# Altium PCB Mosione.PcbDoc
Units mm, origin at the board's own origin, x right, y up, seen from the top; angles counter-clockwise.
Board outline 70.36 x 44.96 mm, 2 copper layers (Top Layer, Bottom Layer); 21 components, 31 nets, 104 pads, 14 vias.
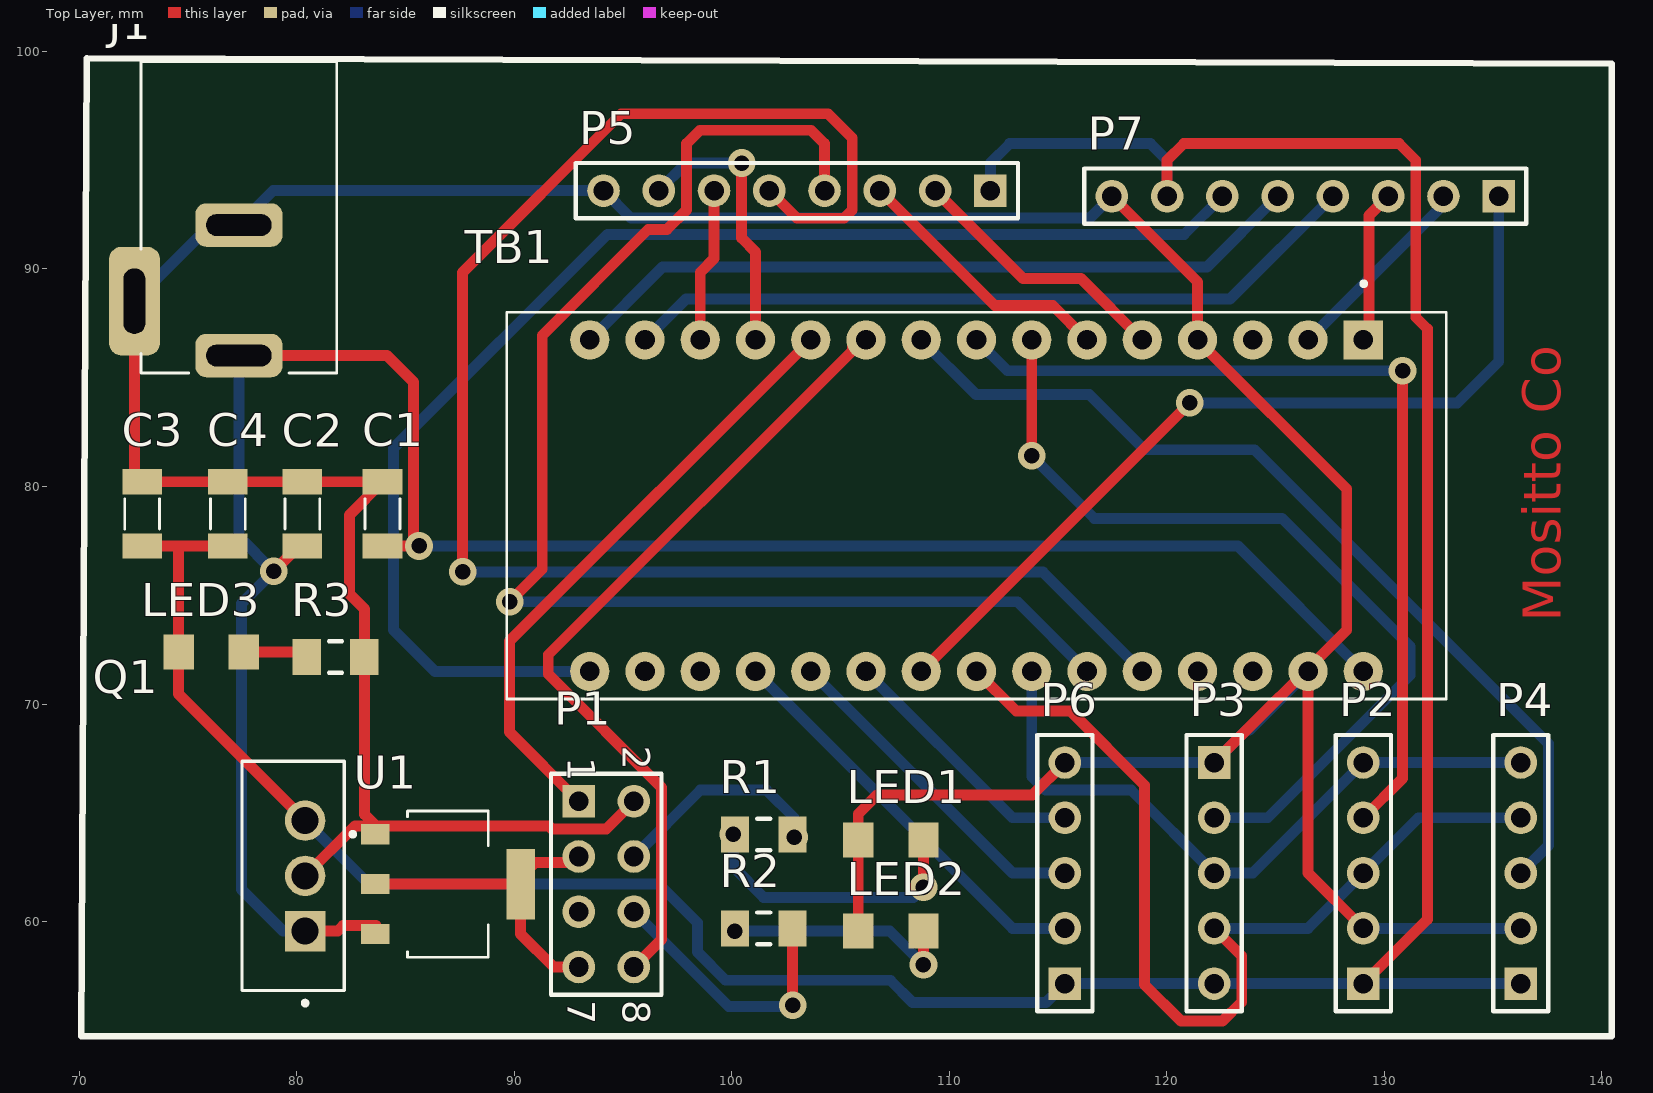
[diagram p0: Top Layer view]
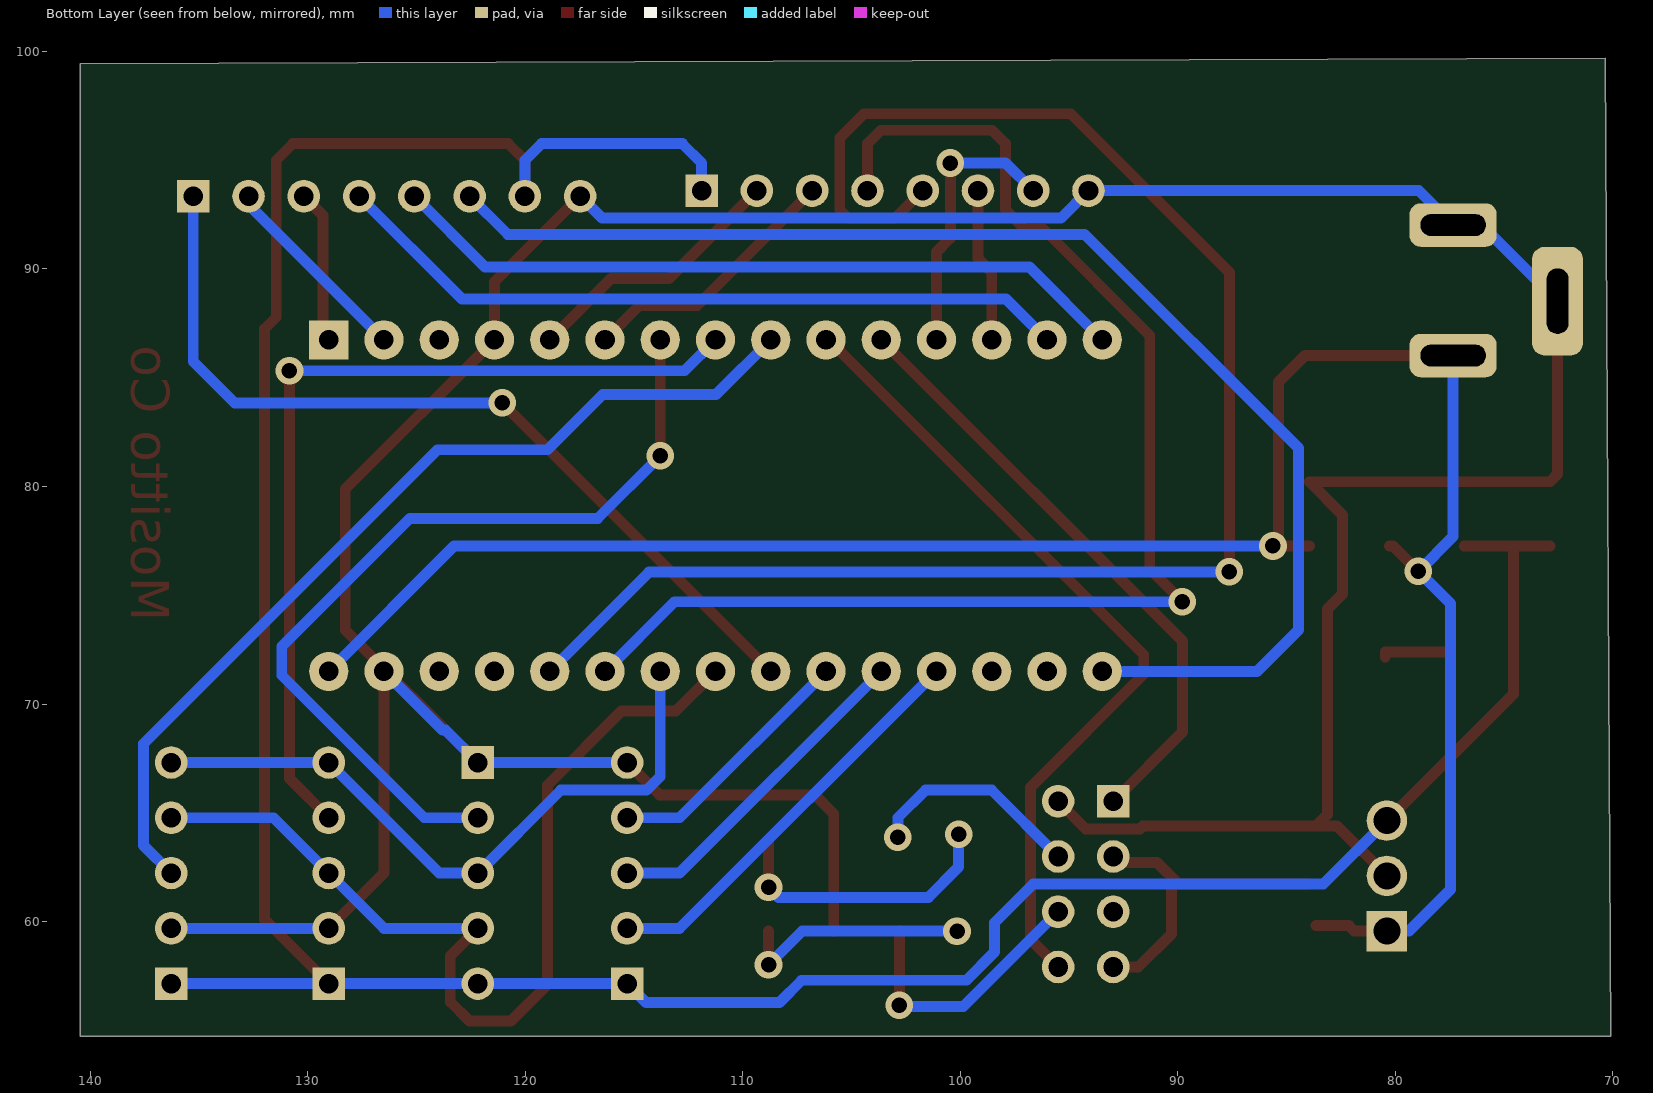
[diagram p1: Bottom Layer view, seen from below]
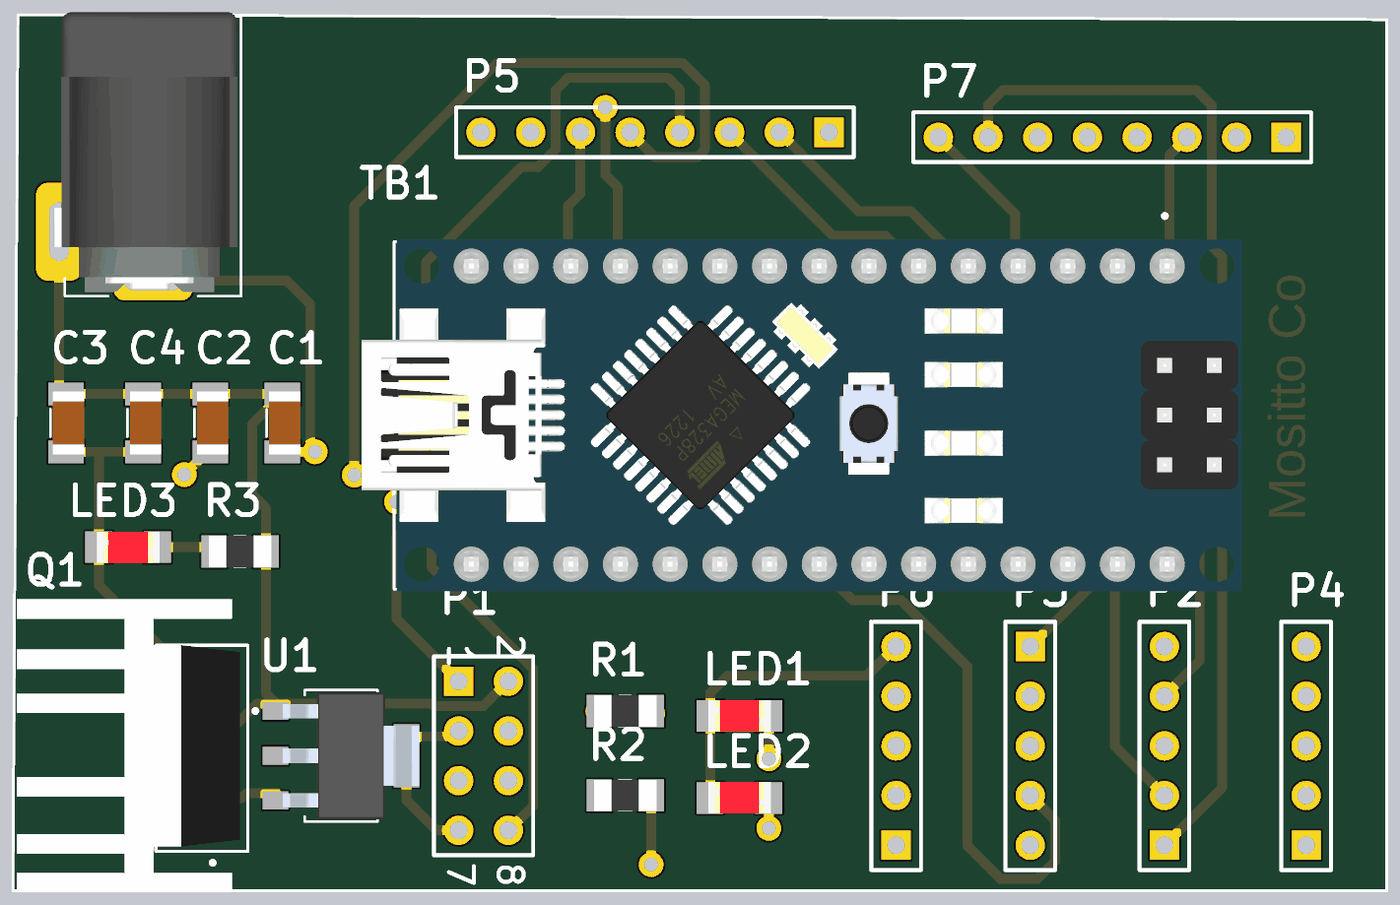
[diagram p2: 3D render of the assembled board from above, using the file's embedded part models]

## Layer stack, top to bottom
Top Solder: solder mask 0.0102, Solder Resist, Dk 3.5
Top Layer: signal copper 0.0356
Dielectric 1: dielectric 0.32, FR-4, Dk 4.8
Bottom Layer: signal copper 0.0356
Bottom Solder: solder mask 0.0102, Solder Resist, Dk 3.5

## Board outline
70.104,54.737 70.358,99.695 140.462,99.441 140.462,54.737

## Design rules (kind name [scope] priority, off if disabled: settings)
Clearance [All] p1: gap=0.254 ignorepadtopadclearanceinfootprint=FALSE except(0: Arc-Hole Track-Hole SMDPad-Hole THPad-Hole Via-Hole Fill-Hole Poly-Hole Region-Hole Text-Hole)
PolygonConnect [All] p1: connectstyle=Relief reliefconductorwidth=0.254 reliefentries=4 polygonreliefangle="90 Angle" airgapwidth=0.254
RoutingVias [All] p1: holewidth=0.711 width=1.27 viastyle="Through Hole" minholewidth=0.711 minwidth=1.27 maxholewidth=0.711 maxwidth=1.27
SolderMaskExpansion [All] p1: expansion=0.102
Width [All] p1: maxlimit=1 minlimit=0.3 preferedwidth=0.5 minimp=50.000000 maximp=50.000000 favimp=50.000000
30 further rules are at their usual default settings.

## Components (designator, comment, footprint, x,y, rotation, side; value= is the part's Value field where it differs from the comment)
C1 "2.2uf" *CAPC320160X94 83.947,78.74 r90 top
C2 "2.2uf" *CAPC320160X94 80.264,78.74 r90 top
C3 "100nf" *CAPC320160X94 72.898,78.74 r90 top
C4 "2.2uf" *CAPC320160X94 76.835,78.74 r90 top
J1 "DC-005" *NINIGI_DC-005 77.343,88.519 r270 top
LED1 "597-3111-407F" *LED_597-3111-407F 107.315,63.754 r0 top
LED2 "597-3111-407F" *LED_597-3111-407F 107.315,59.563 r0 top
LED3 "597-3111-407F" *LED_597-3111-407F 76.073,72.39 r180 top
P1 "Header 4X2" HDR2X4 92.964,65.532 r270 top
P2 "LCD face" HDR1X5 129.032,57.15 r90 top
P3 "PCD" HDR1X5 122.174,67.31 r270 top
P4 "LCD_Abdominal" HDR1X5 136.271,57.15 r90 top
P5 "Motor" HDR1X8 111.887,93.599 r180 top
P6 "IR_sensor" HDR1X5 115.316,57.15 r90 top
P7 "Extra" HDR1X8 135.255,93.345 r180 top
Q1 "LM7805CT/NOPB" TO254P1054X470X2600-3 80.391,59.563 r90 top locked
R1 "1k" RESC3216X06N 101.473,64.008 r180 top
R2 "1k" RESC3216X06N 101.473,59.69 r180 top
R3 "1K" RESC3216X06N 81.788,72.167 r180 top
TB1 "ARDUINO_NANO" *SHIELD_ARDUINO_NANO 111.252,79.121 r270 top
U1 "AMS1117-3.3" *SOT229P700X180-4N 86.952,61.722 r270 top

## Footprints (in the part's own frame and the unit in brackets; to place one, negate y for a bottom-side part, rotate by r counter-clockwise, add the part's x,y. Pads: shape width x height; smd on the part's side, far side on the other; paste and mask are expansions set on the pad)
*CAPC320160X94 [mm]
  rect 1.16x1.82 smd: 1(-1.475,0) 2(1.475,0)
  silkscreen extent -0.7,-0.8 0.7,0.8, body extent -1.6,-0.93 1.6,0.67, height 0.6
*LED_597-3111-407F [mil]
  rect 55x63 smd: 1(-59,0) 2(59,0)
  body extent -63,-31 63,32, height 44
*NINIGI_DC-005 [mm]
  rrect50% 5x2.35 hole 1 slot 3 at 0 deg: 2(0,-4.8)
  rrect50% 2x4 hole 1 slot 3 at 90 deg: 3(-3.5,0) 4(2.5,0)
  silkscreen extent -11,-4.5 3.3,4.5, body extent -11.21,-5.08 3.09,4.32, height 11
*SHIELD_ARDUINO_NANO [mm]
  rect 1.8x1.8 hole 0.9: 1(-7.62,17.78)
  round 1.8 hole 0.9: 2(-7.62,15.24) 3(-7.62,12.7) 4(-7.62,10.16) 5(-7.62,7.62) 6(-7.62,5.08) 7(-7.62,2.54) 8(-7.62,0) 9(-7.62,-2.54) 10(-7.62,-5.08) 11(-7.62,-7.62) 12(-7.62,-10.16) 13(-7.62,-12.7) 14(-7.62,-15.24) 15(-7.62,-17.78) 16(7.62,-17.78) 17(7.62,-15.24) 18(7.62,-12.7) 19(7.62,-10.16) 20(7.62,-7.62) 21(7.62,-5.08) 22(7.62,-2.54) 23(7.62,0) 24(7.62,2.54) 25(7.62,5.08) 26(7.62,7.62) 27(7.62,10.16) 28(7.62,12.7) 29(7.62,15.24) 30(7.62,17.78)
  silkscreen extent -10.3,-21.59 8.89,21.59, body extent -9.02,-23.26 8.98,21.74, height 10.1
*SOT229P700X180-4N [mm]
  rect 0.93x1.31 smd: 1(-2.29,-3.345) 2(0,-3.345) 3(2.29,-3.345)
  rect 3.24x1.31 smd: 4(0,3.345)
  silkscreen extent -3.36,-4.47 3.36,1.86, body extent -3.25,-2.99 3.25,4.01, height 1.73
HDR1X5 [mm] "Connector; Header; 5 Position"
  rect 1.5x1.5 hole 0.9: 1(0,0)
  round 1.5 hole 0.9: 2(2.54,0) 3(5.08,0) 4(7.62,0) 5(10.16,0)
  silkscreen extent -1.27,-1.27 11.43,1.27
HDR1X8 [mm] "Connector; Header; 8 Position"
  rect 1.5x1.5 hole 0.9: 1(0,0)
  round 1.5 hole 0.9: 2(2.54,0) 3(5.08,0) 4(7.62,0) 5(10.16,0) 6(12.7,0) 7(15.24,0) 8(17.78,0)
  silkscreen extent -1.27,-1.27 19.05,1.27
HDR2X4 [mm] "Connector; Header; 4x2 Position"
  rect 1.5x1.5 hole 0.9: 1(0,0)
  round 1.5 hole 0.9: 2(0,2.54) 3(2.54,0) 4(2.54,2.54) 5(5.08,0) 6(5.08,2.54) 7(7.62,0) 8(7.62,2.54)
  silkscreen extent -1.27,-1.27 8.89,3.81
RESC3216X06N [mm] "Chip Resistor, 2-Leads, Body 3.20x1.60mm, IPC Medium Density"
  rect 1.3x1.65 smd: 1(-1.325,0) 2(1.325,0)
  silkscreen extent -0.3,-0.73 0.3,0.73, body extent -1.6,-0.8 1.6,0.8, height 0.55
TO254P1054X470X2600-3 [mm]
  rect 1.86x1.86 hole 1.24: 1(0,0)
  round 1.86 hole 1.24: 2(2.54,0) 3(5.08,0)
  silkscreen extent -3.41,-1.8 7.81,2.9, body extent -4.83,-1.4 10.17,10, height 21.5

## Part data
C1 C2 C3 C4: library part 12065C824KAZ2A, "Cap Ceramic 0.82uF 50V X7R 10% SMD 1206 125Â°C Paper T/R", Package="1206 AVX", Availability=Unavailable, MF=AVX, MP=12065C824KAZ2A, PRICE=None, SnapEDA_Link=https://www.snapeda.com/parts/12065C824KAZ2A/AVX/view-part/?ref=snap
J1: Package="0603 Ninigi", Availability=Unavailable, MF="Littelfuse Inc.", MP=DC-005, PRICE=None, SnapEDA_Link=https://www.snapeda.com/parts/DC-005/Littelfuse%20Inc./view-part/?ref=snap
LED1 LED2 LED3: "LED RED CLEAR 1206 SMD", Package="1206 Dialight", Availability=Unavailable, MF=Dialight, MP=5973111407F, PRICE=None, SnapEDA_Link=https://www.snapeda.com/parts/5973111407F/Dialight/view-part/?ref=snap
P1: "Header, 4-Pin, Dual row", LatestRevisionDate=17-Jul-2002, LatestRevisionNote="Re-released for DXP Platform.", Publisher="Altium Limited"
P2 P3 P4 P6: library part "Header 5", "Header, 5-Pin", LatestRevisionDate=17-Jul-2002, LatestRevisionNote="Re-released for DXP Platform.", Publisher="Altium Limited"
P5 P7: library part "Header 8", "Header, 8-Pin", LatestRevisionDate=17-Jul-2002, LatestRevisionNote="Re-released for DXP Platform.", Publisher="Altium Limited"
Q1: "Linear Voltage Regulator IC 1 Output 1A TO-220-3", Package="TO-220 ON Semiconductor", Availability=Unavailable, MF="ON Semiconductor", MP=LM7805CT, PRICE=None, SnapEDA_Link=https://www.snapeda.com/parts/LM7805CT/ON%20Semiconductor/view-part/546231/?ref=snap
R1 R2 R3: library part RC1206FR-0724R3L, "RC Series 1206 0.25 W 24.3 Ohms 1% ±100 ppm/°C SMT Thick Film Chip Resistor", Package="1206 Yageo", Availability=Unavailable, MF=Yageo, MP=RC1206FR-0724R3L, PRICE=None, SnapEDA_Link=https://www.snapeda.com/parts/RC1206FR-0724R3L/Yageo/view-part/?ref=snap
TB1: "ATmega4809 Arduino Nano Every with Headers AVR® AVR MCU 8-Bit Embedded Evaluation Board", Package=None, Availability=Unavailable, MF=Arduino, MP="ARDUINO NANO", PRICE=None, SnapEDA_Link=https://www.snapeda.com/parts/ARDUINO%20NANO/Arduino/view-part/1128261/?ref=snap
U1: Package=None, Availability=Unavailable, MF=AMD, MP=AMS1117-3.3, PRICE=None, SnapEDA_Link=https://www.snapeda.com/parts/AMS1117-3.3/AMD/view-part/?ref=snap

## Via types
v1: diameter 1.27, hole 0.711, Top Layer to Bottom Layer, 14 vias

## Nets (pads, with @x,y where several pads share a name; then routed paths per layer and width w, separated by ;. In a path a pad name is that pad's centre, name@x,y a point inside that pad or via, vN(x,y) a via of type N, cw(c..) or ccw(c..) an arc to the next point about the centre after c; other vN are vias at no path point)
3.3V: P1.3 P1.7 U1.2 U1.4 | length 15
  Top Layer w0.5: U1.2@84.031,61.722 89.959,61.722 90.953,62.717 92.689,62.717 P1.3 ; U1.4 90.297,59.436 91.821,57.912 P1.7
9V: C1.1 C2.1 J1.4 Q1.1 TB1.30 U1.3 | length 98.8
  Top Layer w0.5: J1.4 84.161,86.019 85.369,84.811 v1@85.369,77.265 ; v1(78.943,76.097) 80.112,77.265 C2.1 ; Q1.1 81.89,59.563 82.14,59.813 U1.3@83.65,59.813 ; C1.1 v1@85.369,77.265 ; v1(85.625,77.267) 85.623,77.265 v1@85.369,77.265
  Bottom Layer w0.5: J1.4@77.876,86.019 J1.4 77.343,77.697 v1(78.943,76.097) 77.47,74.623 77.47,61.468 79.375,59.563 Q1.1 ; v1(85.625,77.267) 123.266,77.267 TB1.30
A3: P7.1 TB1.22 | length 40
  Top Layer w0.5: TB1.22 v1(121.056,83.845)
  Bottom Layer w0.5: v1(121.056,83.845) 133.35,83.845 135.255,85.75 P7.1
CS_LCD_Abdominal: P4.3 TB1.9 | length 43
  Bottom Layer w0.5: TB1.9 111.227,84.226 116.434,84.226 118.974,81.686 124.028,81.686 137.541,68.174 137.541,63.5 P4.3
CS_LCD_face: P2.4 TB1.8 | length 41.5
  Top Layer w0.5: P2.4 130.835,66.573 v1(130.835,85.319)
  Bottom Layer w0.5: TB1.8 112.674,85.319 v1(130.835,85.319)
CS_PCA: P3.2 TB1.7 | length 39.4
  Top Layer w0.5: v1(113.792,81.407) TB1.7
  Bottom Layer w0.5: v1(113.792,81.407) 116.662,78.537 125.298,78.537 131.191,72.644 131.191,71.323 124.638,64.77 P3.2
D0: P7.2 TB1.2 | length 9.2
  Bottom Layer w0.5: TB1.2 132.715,92.964 P7.2
D1: P7.3 TB1.1 | length 7.1
  Top Layer w0.5: TB1.1 129.286,86.995 129.286,92.456 P7.3
D11: P7.4 TB1.14 | length 34.4
  Bottom Layer w0.5: TB1.14 97.892,88.621 122.911,88.621 P7.4
D12: P7.5 TB1.15 | length 34.4
  Bottom Layer w0.5: TB1.15 96.825,90.094 121.844,90.094 P7.5
D13: P7.6 TB1.16 | length 61.1
  Bottom Layer w0.5: TB1.16 86.36,71.501 84.455,73.406 84.455,81.763 94.283,91.591 120.801,91.591 P7.6
ENA: P5.6 TB1.13 | length 7.1
  Top Layer w0.5: TB1.13 98.552,89.84 99.187,90.475 P5.6
ENB: P5.7 TB1.12 | length 12.7
  Top Layer w0.5: v1(100.457,94.869) 100.457,91.415 101.092,90.78 TB1.12
  Bottom Layer w0.5: P5.7 97.917,94.869 v1(100.457,94.869)
GND: C1.2 C2.2 C3.2 C4.2 J1.2 J1.3 LED1.1 LED2.1 P1.2 P2.2 P3.1 P4.2 P5.8 P6.5 P7.8 Q1.2 R3.1 TB1.4 TB1.29 U1.1 | length 183
  Top Layer w0.5: J1.2 72.543,80.57 C3.2 C4.2 C2.2 C1.2 82.423,78.691 82.423,75.057 83.113,74.367 R3.1 83.113,64.93 U1.1@83.65,64.393 ; Q1.2 82.681,64.393 U1.1@83.65,64.393 ; P1.2 94.234,64.262 91.745,64.262 91.614,64.393 U1.1@83.65,64.393 ; LED2.1 LED1.1 105.816,64.948 106.68,65.811 113.817,65.811 P6.5 ; P7.8 121.412,89.408 TB1.4 128.27,79.883 128.27,73.406 P3.1 ; TB1.29 126.492,62.23 P2.2
  Bottom Layer w0.5: J1.2 76.043,92.019 J1.3 78.923,93.599 P5.8 95.361,92.345 116.475,92.345 P7.8 ; P6.5 P3.1 123.675,68.811 123.802,68.811 TB1.29 ; P2.2 P4.2
IN1: P5.2 TB1.5 | length 12.4
  Top Layer w0.5: P5.2 113.386,89.56 116.053,89.56 TB1.5
IN2: P5.3 TB1.6 | length 12.4
  Top Layer w0.5: P5.3 112.09,88.316 114.757,88.316 TB1.6
IN3: P5.4 TB1.25 | length 61.8
  Top Layer w0.5: v1(89.789,74.701) 91.288,76.2 91.288,86.944 96.164,91.821 97.028,91.821 97.917,92.71 97.917,95.758 98.536,96.377 103.648,96.377 104.267,95.758 P5.4
  Bottom Layer w0.5: v1(89.789,74.701) 113.132,74.701 TB1.25
IN4: P5.5 TB1.26 | length 76.1
  Top Layer w0.5: v1(87.63,76.073) 87.63,89.84 94.921,97.131 104.418,97.131 105.537,96.012 105.537,92.71 105.156,92.329 102.997,92.329 P5.5
  Bottom Layer w0.5: v1(87.63,76.073) 114.3,76.073 TB1.26
IR_1: P6.2 TB1.19 | length 19.1
  Bottom Layer w0.5: TB1.19 112.903,59.69 P6.2
IR_2: P6.3 TB1.20 | length 15.5
  Bottom Layer w0.5: TB1.20 112.903,62.23 P6.3
IR_3: P6.4 TB1.21 | length 11.9
  Bottom Layer w0.5: TB1.21 112.903,64.77 P6.4
NetLED1_2: LED1.2 R1.2 | length 13.3
  Top Layer w0.5: v1(100.076,64.008) R1.2 ; v1(108.814,61.57) LED1.2
  Bottom Layer w0.5: v1(100.076,64.008) 100.076,62.505 101.469,61.112 108.356,61.112 v1(108.814,61.57)
NetLED2_2: LED2.2 R2.2 | length 10.9
  Top Layer w0.5: v1(108.814,58.014) LED2.2
  Bottom Layer w0.5: v1(100.148,59.563) 107.264,59.563 v1(108.814,58.014)
NetLED3_1: LED3.1 R3.2 | length 3.1
  Top Layer w0.5: LED3.1 80.463,72.39 R3.2
NetP1_4: P1.4 R1.1 | length 10.4
  Bottom Layer w0.5: P1.4 98.552,66.04 101.6,66.04 102.87,64.77 102.87,64.16 102.591,63.881 v1(102.87,63.881)
NetP1_6: P1.6 R2.1 | length 12.7
  Top Layer w0.5: v1(102.798,56.159) R2.1@102.798,59.563
  Bottom Layer w0.5: P1.6 99.861,56.095 102.277,56.095 102.569,56.388 v1(102.798,56.159)
RX2: P1.1 TB1.11 | length 28.3
  Top Layer w0.5: P1.1 89.789,68.707 89.789,72.898 TB1.11
SCL: P2.5 P3.3 P4.5 TB1.24 | length 31.3
  Bottom Layer w0.5: TB1.24 113.792,66.675 114.427,66.04 118.364,66.04 P3.3 123.952,62.23 P2.5 P4.5
SDA: P2.3 P3.4 P4.4 TB1.23 | length 44.7
  Top Layer w0.5: TB1.23 113.081,69.672 115.57,69.672 118.974,66.269 118.974,57.099 120.65,55.423 122.555,55.423 123.444,56.312 123.444,58.42 P3.4
  Bottom Layer w0.5: P3.4 126.492,59.69 P2.3 131.572,64.77 P4.4
TX2: P1.8 TB1.10 | length 37.9
  Top Layer w0.5: P1.8 96.774,59.182 96.774,66.167 91.567,71.374 91.567,72.263 105.537,86.233 105.537,86.741 TB1.10
VCC: C3.1 C4.1 LED3.2 P2.1 P3.5 P4.1 P5.1 P6.1 P7.7 Q1.3 | length 144.2
  Top Layer w0.5: C3.1 74.638,77.265 ; C4.1 74.638,77.265 ; Q1.3 74.574,70.46 LED3.2 74.574,77.201 74.638,77.265 ; P7.7 120.015,94.996 120.777,95.758 130.683,95.758 131.445,94.996 131.445,87.78 131.974,87.251 131.974,60.092 P2.1
  Bottom Layer w0.5: Q1.3 83.312,61.722 96.647,61.722 98.425,59.944 98.425,58.597 99.72,57.302 107.29,57.302 108.306,56.286 114.452,56.286 P6.1 P3.5 P2.1 P4.1 ; P5.1 111.887,94.869 112.776,95.758 119.253,95.758 120.015,94.996 P7.7
pads on no net: P1.5 TB1.3 TB1.17 TB1.18 TB1.27 TB1.28

## Other copper
Top Layer:
  text "Mositto Co" at 138.684,73.787 h3 r90
Bottom Layer:
  region: 100.076,61.341
  region: 100.203,61.087
  region: 100.076,61.341

## Silkscreen, mask and mechanical layers (free items; w line width, h text height)
Top Overlay:
  the board outline again, w0.3

## Text inside footprints (layer, text, board x,y; h text height)
P1: Top Overlay "2" at 94.996,68.072 h1.27 r270; Top Overlay "1" at 92.456,67.564 h1.27 r270; Top Overlay "7" at 92.456,56.388 h1.27 r270; Top Overlay "8" at 94.996,56.388 h1.27 r270